# Altium PCB head.PcbDoc
Units mm, origin at the board's own origin, x right, y up, seen from the top; angles counter-clockwise.
Board outline 15 x 25 mm, 4 copper layers (Top Layer, GND, PWR, Bottom Layer), stack 1.571 mm thick; 25 components, 22 nets, 90 pads, 34 vias.
Unrouted connection lines stored in the file: 16.
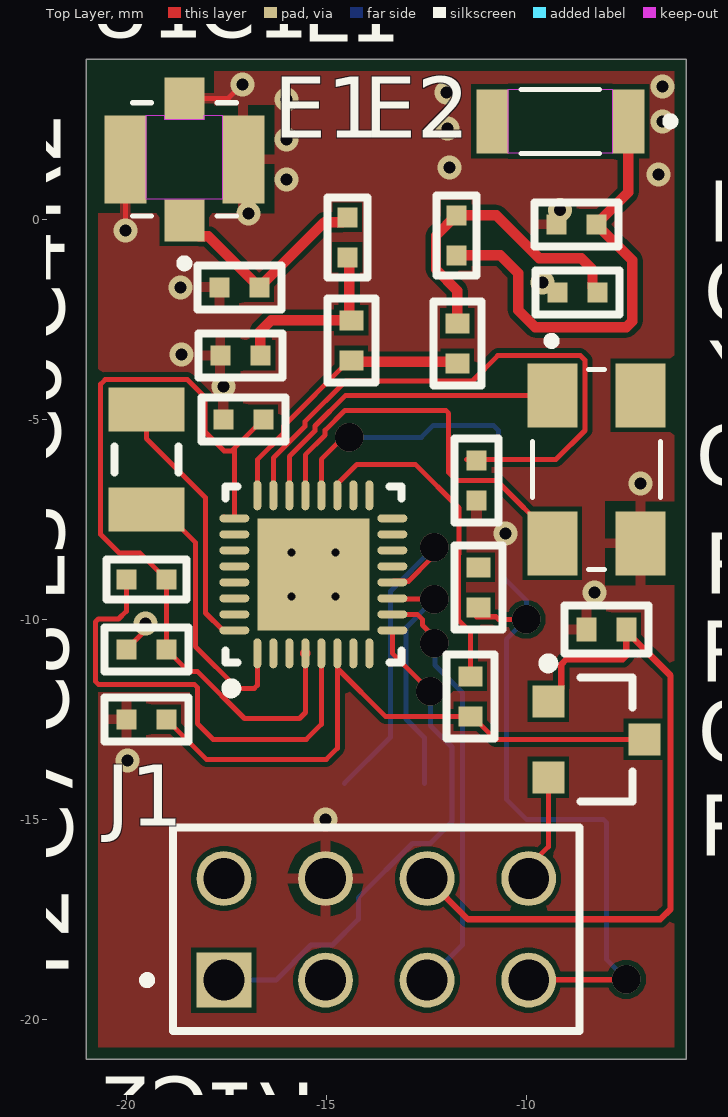
[diagram p0: Top Layer view]
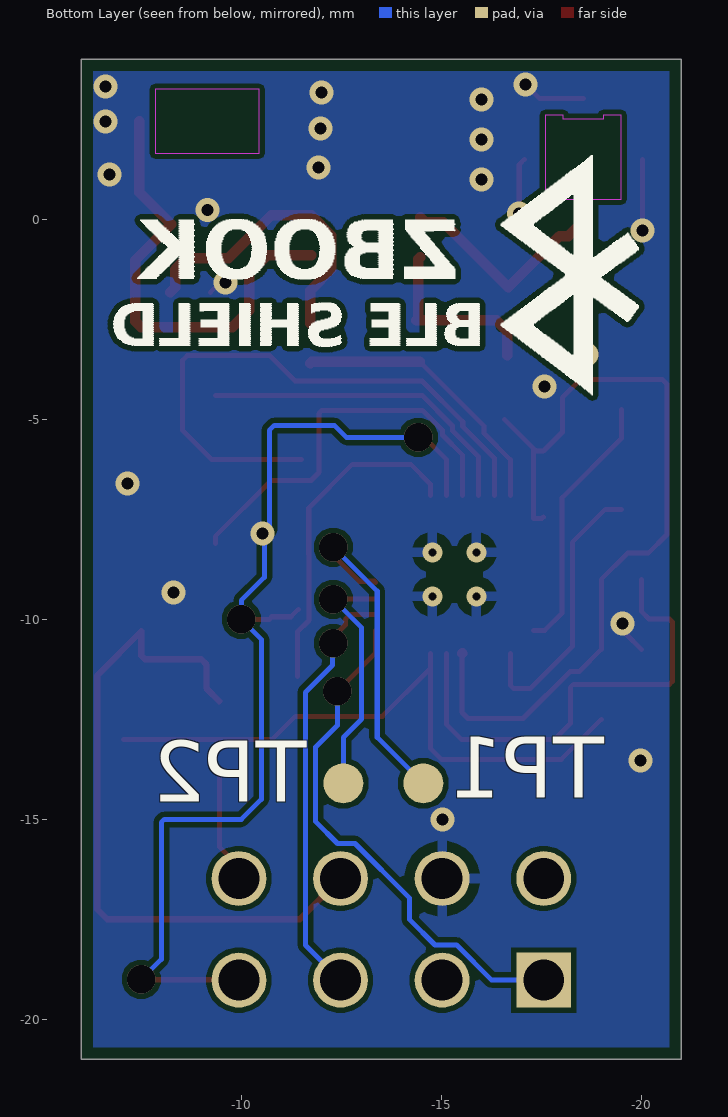
[diagram p1: Bottom Layer view, seen from below]
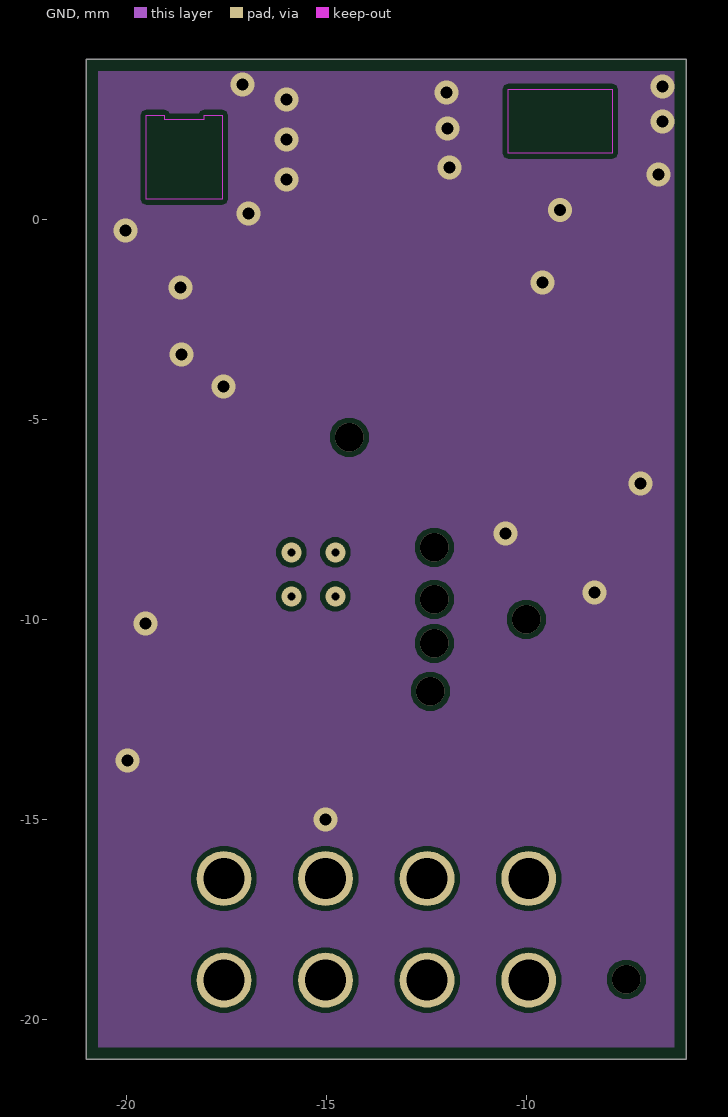
[diagram p2: GND]
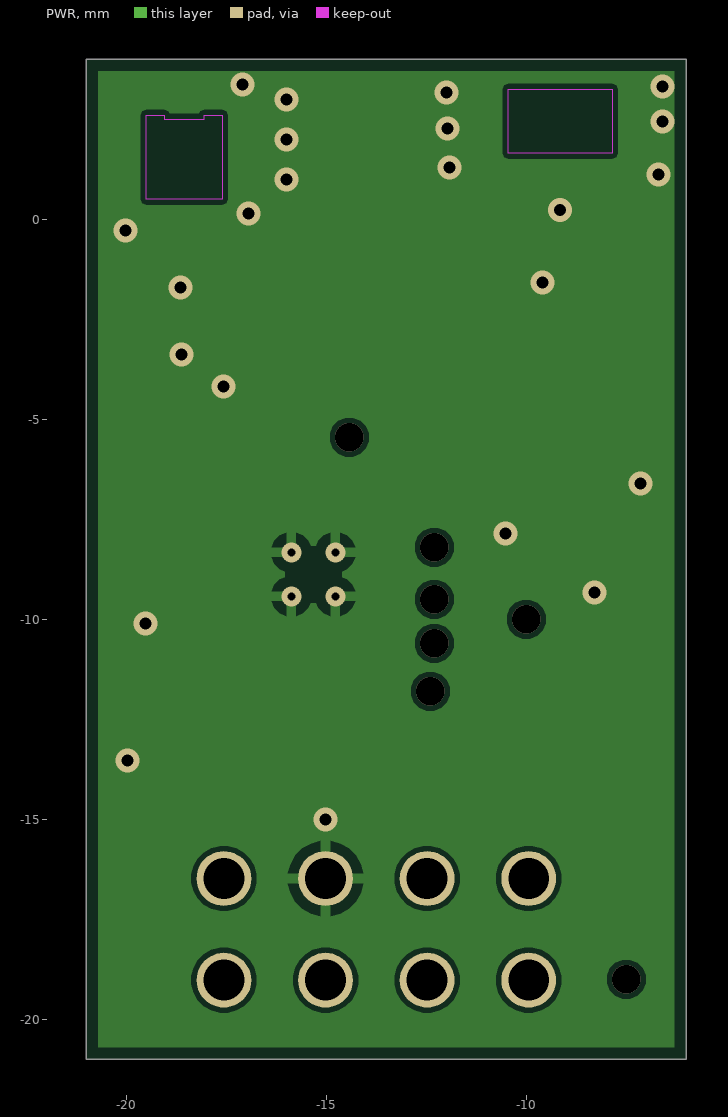
[diagram p3: PWR]
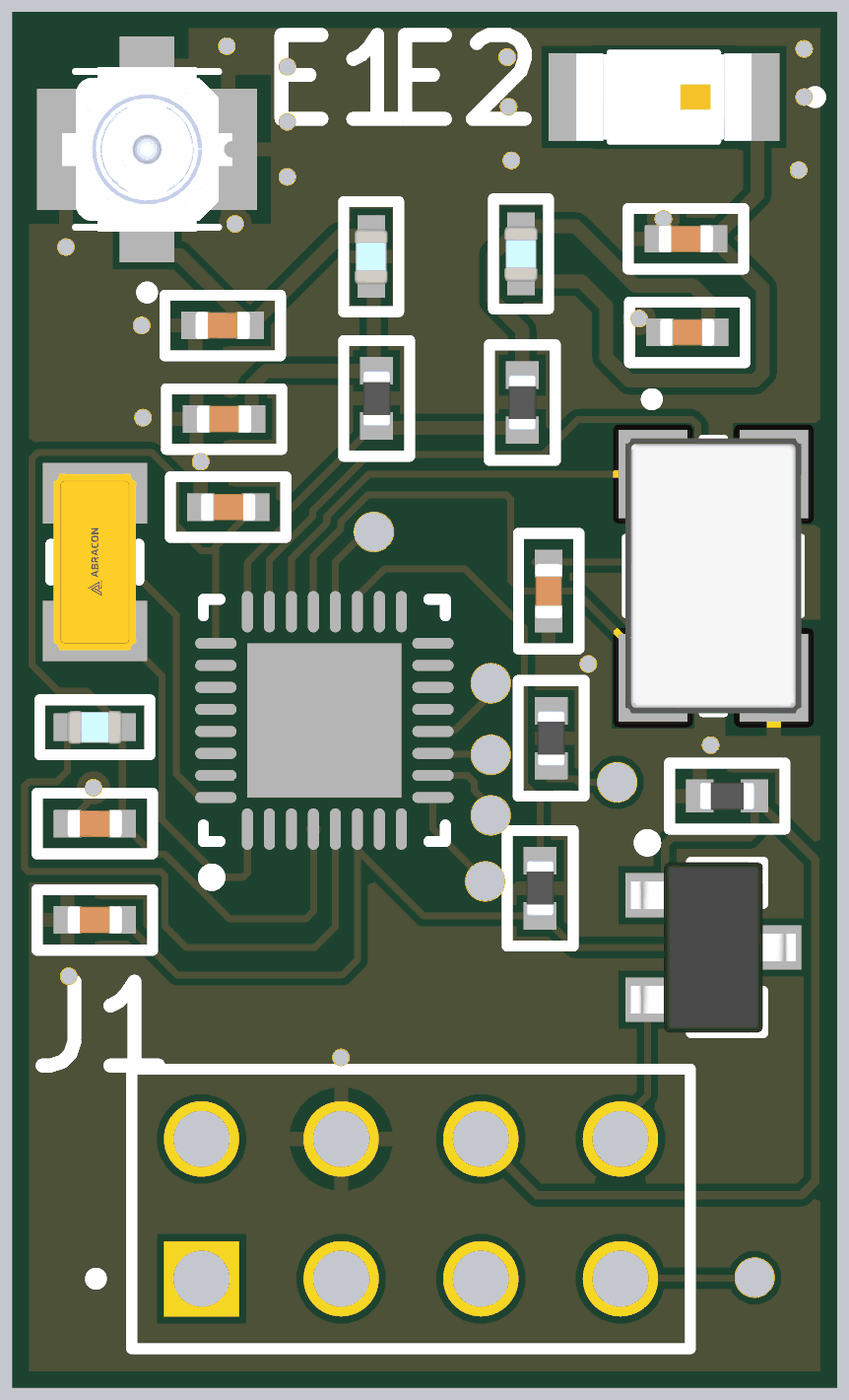
[diagram p4: 3D render of the assembled board from above, using the file's embedded part models]

## Layer stack, top to bottom
Top Solder: solder mask 0.0102, Solder Resist, Dk 3.5
Top Layer: signal copper 0.0356
Dielectric 2: prepreg 0.2, PP-006, Dk 4.1
GND: signal copper 0.0175
Dielectric 1: dielectric 1.065, FR-4, Dk 4.8
PWR: signal copper 0.0175
Dielectric 3: prepreg 0.2, PP-006, Dk 4.1
Bottom Layer: signal copper 0.0356
Bottom Solder: solder mask 0.0102, Solder Resist, Dk 3.5

## Board outline
-21,-21 -21,4 -6,4 -6,-21

## Design rules (kind name [scope] priority, off if disabled: settings)
Clearance [All] p1: gap=0.127 ignorepadtopadclearanceinfootprint=FALSE
PolygonConnect [All] p1: connectstyle=Relief reliefconductorwidth=0.254 reliefentries=4 polygonreliefangle="90 Angle" airgapwidth=0.254
RoutingVias [All] p1: holewidth=0.711 width=1.27 viastyle="Through Hole" minholewidth=0.711 minwidth=1.27 maxholewidth=0.711 maxwidth=1.27
SolderMaskExpansion [All] p1: expansion=0 istentingtop=FALSE
SupplyNets "Schematic Supply Nets_2" [InNet('GND')] p1: voltage=0.000
SupplyNets "Schematic Supply Nets_1" [InNet('VCC')] p2: voltage=0.000
SupplyNets "Schematic Supply Nets" [InNet('VDC')] p3: voltage=0.000
Width [All] p1: maxlimit=2 minlimit=0.127 preferedwidth=0.25 minimp=50.000000 maximp=50.000000 favimp=50.000000
30 further rules are at their usual default settings.

## Components (designator, comment, footprint, x,y, rotation, side; value= is the part's Value field where it differs from the comment)
C1 "NC" C0402#1 -17.175,-1.7 r0 top
C2 "NC" C0402#1 -17.15,-3.4 r0 top
C3 "NC" C0402#2 -8.725,-1.825 r0 top
C4 "NC" C0402#2 -8.75,-0.125 r0 top
C5 "0.47 uF" C0402#1 -11.245,-6.527 r90 top
C6 "0.1 uF" C0402#1 -17.075,-5 r0 top
C7 "2.2 uF" C0402#1 -19.5,-12.5 r0 top
C8 "4.7 uF" C0402#1 -19.5,-10.75 r0 top
E1 "20441-001E-01" IPEX_20441-001E-01 -18.55,1.5 r0 top
E2 "2450AT18A0100001E" XCVR_2450AT18A0100001E -9.15,2.45 r180 top
J1 "MTSW-104-07-T-D-240-LL" SAMTEC_MTSW-104-07-T-D-240-LL -13.75,-17.75 r0 top
L1 "0R" L0402 -14.475,-0.45 r270 top
L2 "0R" L0402 -11.75,-0.4 r270 top
L3 "10uH" L0402 -19.5,-9 r0 top
Q1 "AO3401A" AO-SOT-23-3L_V -8.25,-13 r0 top
R1 "0 R" R0402 -14.375,-3.025 r90 top
R2 "0 R" R0402 -11.725,-3.1 r90 top
R3 "10K" R0402 -8,-10.25 r0 top
R4 "10K" R0402 -11.4,-11.925 r270 top
R5 "10K" R0402 -11.2,-9.2 r90 top
TP1 "TestPoint" "Test Point" -14.55,-14.1 r90 top
TP2 "TestPoint" "Test Point" -12.55,-14.1 r90 top
U1 "CH592X" QFN40P400X400X80_HS-33N -15.325,-8.875 r90 top
Y1 "ECS-320-10-30B-CKM-TR" XTAL_ECS-320-10-30B-CKM-TR -8.25,-6.25 r270 top
Y2 "ABS07-32.768KHZ-T" FP-ABS07-MFG -19.5,-6 r90 top

## Footprints (in the part's own frame and the unit in brackets; to place one, negate y for a bottom-side part, rotate by r counter-clockwise, add the part's x,y. Pads: shape width x height; smd on the part's side, far side on the other; paste and mask are expansions set on the pad)
AO-SOT-23-3L_V [mm] "SOT23, 3-Leads, Body 3.1x1.8mm, Pitch 0.95mm"
  rect 0.8x0.8 smd: 1(-1.2,0.95) 2(-1.2,-0.95) 3(1.2,0)
  silkscreen extent -1.32,-1.55 0.9,2.02, body extent -1.5,-1.55 1.5,1.55, height 1.25
C0402#1 [mm]
  rect 0.5x0.5 smd: 1(-0.5,0) 2(0.5,0)
  silkscreen extent -1.05,-0.55 1.05,0.55, body extent -0.5,-0.25 0.5,0.25, height 0.51
C0402#2 [mm]
  rect 0.5x0.5 smd mask+0: 1(-0.5,0)
  rect 0.5x0.5 smd: 2(0.5,0)
  silkscreen extent -1.05,-0.55 1.05,0.55, body extent -0.5,-0.25 0.5,0.25, height 0.51
FP-ABS07-MFG [mm]
  rect 1.1x1.9 smd paste+0 mask+0: 1(-1.25,0) 2(1.25,0)
  silkscreen extent -0.33,-0.8 0.33,0.8, body extent -1.9,-1.05 1.9,1.05, height 0.25
IPEX_20441-001E-01 [mm]
  rect 1x1.05 smd: 1(0,-1.525) G2(0,1.525)
  rect 1.05x2.2 smd: G1(-1.475,0) G3(1.475,0)
  Keep-Out Layer region: 0.95,-1 -0.95,-1 -0.95,1.1 -0.5,1.1 -0.5,1 0.5,1 0.5,1.1 0.95,1.1
  silkscreen extent -1.3,-2.7 1.3,1.41, body extent -1.5,-1.55 1.5,1.55, height 1.25
L0402 [mm]
  rect 0.5x0.5 smd: 1(-0.5,0) 2(0.5,0)
  silkscreen extent -1,-0.5 1,0.5, body extent -0.5,-0.3 0.5,0.3, height 0.51
QFN40P400X400X80_HS-33N [mm] "QFN, 32-Leads, Body 4,00x4,00mm, Pitch 0,40mm, Thermal Pad 2,80x2,80mm, IPC Medium Density"
  rect 2.8x2.8 smd: 0(0,0)
  oval 0.75x0.2 smd: 1(-1.975,1.4) 2(-1.975,1) 3(-1.975,0.6) 4(-1.975,0.2) 5(-1.975,-0.2) 6(-1.975,-0.6) 7(-1.975,-1) 8(-1.975,-1.4) 17(1.975,-1.4) 18(1.975,-1) 19(1.975,-0.6) 20(1.975,-0.2) 21(1.975,0.2) 22(1.975,0.6) 23(1.975,1) 24(1.975,1.4)
  oval 0.2x0.75 smd: 9(-1.4,-1.975) 10(-1,-1.975) 11(-0.6,-1.975) 12(-0.2,-1.975) 13(0.2,-1.975) 14(0.6,-1.975) 15(1,-1.975) 16(1.4,-1.975) 25(1.4,1.975) 26(1,1.975) 27(0.6,1.975) 28(0.2,1.975) 29(-0.2,1.975) 30(-0.6,1.975) 31(-1,1.975) 32(-1.4,1.975)
  silkscreen extent -2.97,-2.2 2.2,2.2, body extent -2.54,-2.54 2.54,2.54, height 0.25
R0402 [mm]
  rect 0.5x0.6 smd: 1(-0.5,0) 2(0.5,0)
  silkscreen extent -1.05,-0.6 1.05,0.6, body extent -0.5,-0.25 0.5,0.25, height 0.41
SAMTEC_MTSW-104-07-T-D-240-LL [mm]
  rect 1.37x1.37 / inner round 1.37 / far side rect 1.37x1.37 hole 1.02: 01(-3.81,-1.27)
  round 1.37 hole 1.02: 02(-3.81,1.27) 03(-1.27,-1.27) 04(-1.27,1.27) 05(1.27,-1.27) 06(1.27,1.27) 07(3.81,-1.27) 08(3.81,1.27)
  silkscreen extent -5.83,-2.54 5.08,2.54
"Test Point" [mm]
  round 1 smd far side paste-1: 1(0,0)
XCVR_2450AT18A0100001E [mm]
  rect 0.8x1.6 smd: 1(-1.7,0) 2(1.7,0)
  Keep-Out Layer region: 1.3,-0.8 -1.3,-0.8 -1.3,0.8 1.3,0.8
  Keep-Out Layer region: 1.3,-0.8 -1.3,-0.8 -1.3,0.8 1.3,0.8
  silkscreen extent -2.85,-0.8 0.98,0.8, body extent -1.6,-0.8 1.6,0.8, height 1.4
XTAL_ECS-320-10-30B-CKM-TR [mm]
  rect 1.6x1.25 smd paste+0 mask+0.102: 1(-1.85,-1.1) 2(1.85,-1.1) 3(1.85,1.1) 4(-1.85,1.1)
  silkscreen extent -3.31,-1.6 2.5,1.6, body extent -2.5,-1.6 2.5,1.6, height 0.85

## Part data
C1 C2 C3 C4: library part MLCC_0402_NC, "MLCC - NC 0402"
C5: library part "MLCC_0402_0.47 uF", "MLCC - 0.47 uF 0402"
C6: library part "MLCC_0402_0.1 uF", "MLCC - 0.1 uF 0402"
C7: library part "MLCC_0402_2.2 uF", "MLCC - 2.2 uF 0402"
C8: library part "MLCC_0402_4.7 uF", "MLCC - 4.7 uF 0402"
E1: "U.FL (UMCC), I-PEX MHFI Connector Receptacle, Male Pin 50 Ohms Surface Mount Sol", Frequency=9GHz, Manufacturer=I-PEX, Max Operating Temperature=90°C, Min Operating Temperature=-40°C, Supplier Part Number=5378-20441-001E-01DKR-ND, Voltage Rating=60V, Category="RF / Coaxial Connectors", ComponentLink1Description=https://datasheet.octopart.com:443/20441-001E-01-I-PEX-datasheet-180039539.pdf?src-supplier=IHS, ComponentLink1URL=https://datasheet.octopart.com:443/20441-001E-01-I-PEX-datasheet-180039539.pdf?src-supplier=IHS, Contact Material="Gold, Nickel", Export Control Classification Number (ECCN) Code=EAR99, Fastening Type=Snap, Gender=Male, Harmonized Tariff Schedule (HTS) Code=8536.69.40.10, Height=1.45mm, Impedance=50Ω, Lifecycle Status=Production, Manufacturer Part Number=20441-001E-01, Number of Contacts=1, Number of Positions=1, Orientation=Straight, Pricing="1=1,04, 10=0,882, 25=0,8268, 50=0,7872, 100=0,7495, 250=0,70256, 500=0,669, 1000=0,63705, 2500=0,59717 (USD)", REACH SVHC=Unaffected, RoHS=Compliant, Stock=35351, Supplier=DigiKey
E2: "SMD Component, 1206, 2.4GHz, 1.3mm H, Solder Mount, SMD", Clock Frequency=2.5GHz, Manufacturer=Knowles, Max Operating Temperature=125°C, Min Operating Temperature=-40°C, Power Rating=2W, Supplier Part Number=712-2450AT18A0100001EDKR-ND, Bandwidth=100MHz, Category="RF Antennas", ComponentLink1Description=https://datasheet.octopart.com:443/2450AT18A0100001E-Johanson-datasheet-137404838.pdf?src-supplier=Upverter, ComponentLink1URL=https://datasheet.octopart.com:443/2450AT18A0100001E-Johanson-datasheet-137404838.pdf?src-supplier=Upverter, ComponentLink2Description=https://datasheet.octopart.com:443/2450AT18A0100001E-Johanson-datasheet-101575227.pdf?src-supplier=Newark, ComponentLink2URL=https://datasheet.octopart.com:443/2450AT18A0100001E-Johanson-datasheet-101575227.pdf?src-supplier=Newark, Country of Origin=Taiwan, Export Control Classification Number (ECCN) Code=EAR99, Gain=0.5dB, Harmonized Tariff Schedule (HTS) Code=8529.10, Height=1.4mm, Impedance=50Ω, Introduction Date=2024-07-01, Lifecycle Status=Production, Manufacturer Part Number=2450AT18A0100001E, Number of Bands=1, Pricing="1=0,52, 10=0,446, 25=0,4196, 100=0,384, 250=0,36244, 500=0,3472, 1000=0,3328 (USD)", REACH SVHC=Unaffected, Return Loss=9.5dB, RoHS=Compliant, Stock=203443, Supplier=DigiKey
J1: "Conn Unshrouded Header HDR 8 POS 2.54mm Solder ST Top Entry Thru-Hole Bulk", Manufacturer=Samtec, Manufacturer Lifecycle Status=PRODUCTION, Supplier Part Number=612-MTSW-104-07-T-D-240-LL-ND, Category="Headers and Wire Housings", ComponentLink1Description=https://datasheet.octopart.com:443/MTSW-104-07-T-D-240-LL-Samtec-datasheet-97134619.pdf?src-supplier=Samtec, ComponentLink1URL=https://datasheet.octopart.com:443/MTSW-104-07-T-D-240-LL-Samtec-datasheet-97134619.pdf?src-supplier=Samtec, ComponentLink2Description=https://sigma.octopart.com:443/97134620/technical_drawing/Samtec-MTSW-104-07-T-D-240-LL.pdf?src-supplier=Samtec, ComponentLink2URL=https://sigma.octopart.com:443/97134620/technical_drawing/Samtec-MTSW-104-07-T-D-240-LL.pdf?src-supplier=Samtec, ComponentLink3Description=https://datasheet.octopart.com:443/MTSW-104-07-T-D-240-LL-Samtec-datasheet-118493423.pdf?src-supplier=Electro+Sonic, ComponentLink3URL=https://datasheet.octopart.com:443/MTSW-104-07-T-D-240-LL-Samtec-datasheet-118493423.pdf?src-supplier=Electro+Sonic, ComponentLink4Description=https://datasheet.octopart.com:443/MTSW-104-07-T-D-240-LL-Samtec-datasheet-86819181.pdf?src-supplier=Sager+Electronics, ComponentLink4URL=https://datasheet.octopart.com:443/MTSW-104-07-T-D-240-LL-Samtec-datasheet-86819181.pdf?src-supplier=Sager+Electronics, ComponentLink5Description=https://datasheet.octopart.com:443/MTSW-104-07-T-D-240-LL-Samtec-datasheet-166224765.pdf?src-supplier=Sager+Electronics, ComponentLink5URL=https://datasheet.octopart.com:443/MTSW-104-07-T-D-240-LL-Samtec-datasheet-166224765.pdf?src-supplier=Sager+Electronics, ComponentLink6Description=https://datasheet.octopart.com:443/MTSW-104-07-T-D-240-LL-Samtec-datasheet-158401026.pdf?src-supplier=Sager+Electronics, ComponentLink6URL=https://datasheet.octopart.com:443/MTSW-104-07-T-D-240-LL-Samtec-datasheet-158401026.pdf?src-supplier=Sager+Electronics, ComponentLink7Description=https://datasheet.octopart.com:443/MTSW-104-07-T-D-240-LL-Samtec-datasheet-151470471.pdf?src-supplier=Sager+Electronics, ComponentLink7URL=https://datasheet.octopart.com:443/MTSW-104-07-T-D-240-LL-Samtec-datasheet-151470471.pdf?src-supplier=Sager+Electronics, ComponentLink8Description=https://datasheet.octopart.com:443/MTSW-104-07-T-D-240-LL-Samtec-datasheet-180249843.pdf?src-supplier=JRH+Electronics, ComponentLink8URL=https://datasheet.octopart.com:443/MTSW-104-07-T-D-240-LL-Samtec-datasheet-180249843.pdf?src-supplier=JRH+Electronics, ComponentLink9Description=https://datasheet.octopart.com:443/MTSW-104-07-T-D-240-LL-Samtec-datasheet-104272029.pdf?src-supplier=Newark, ComponentLink9URL=https://datasheet.octopart.com:443/MTSW-104-07-T-D-240-LL-Samtec-datasheet-104272029.pdf?src-supplier=Newark, Contact Material=Bronze, Contact Plating=Tin, Gender=Male, Lead Free="Lead Free", Lead Pitch=2.54mm, Lifecycle Status=Production, Manufacturer Part Number=MTSW-104-07-T-D-240-LL, Mounting Technology="Through Hole", Number of Contacts=8, Number of Rows=2, Packaging=Bulk, Pitch=2.54mm, Pricing="1=0,56 (USD)", Radiation Hardening=No, RoHS=Compliant, Supplier=DigiKey, Termination=Solder
L1 L2: library part Inductor_0402, "INDUCTOR - 0R 0402"
L3: library part Inductor_0402_10uH, "INDUCTOR - 10uH - 0402"
Q1: "Transistor: P-MOSFET; unipolar; -30V; 4, 2A; 1, 4W; 85 mOhm; ; -55+150 st.C; SMD; SOT23", Case/Package=TO-236-3, Continuous Drain Current (ID)=4A, Drain to Source Breakdown Voltage=-30V, Drain to Source Resistance=50mΩ, Gate to Source Voltage (Vgs)=12V, Input Capacitance=1.2nF, Manufacturer="Alpha & Omega Semiconductor", Max Junction Temperature (Tj)=150°C, Max Power Dissipation=1.4W, Min Breakdown Voltage=30V, Min Operating Temperature=-55°C, Supplier Part Number=785-1001-6-ND, Threshold Voltage=-900mV, Category=MOSFETs, ComponentLink1Description=https://datasheet.octopart.com:443/AO3401A-Alpha-%26-Omega-Semiconductor-datasheet-11631723.pdf?src-supplier=IHS, ComponentLink1URL=https://datasheet.octopart.com:443/AO3401A-Alpha-%26-Omega-Semiconductor-datasheet-11631723.pdf?src-supplier=IHS, ComponentLink2Description=https://sigma.octopart.com:443/138895710/technical_drawing/Alpha-%26-Omega-Semiconductor-AO3401A.pdf?src-supplier=Upverter, ComponentLink2URL=https://sigma.octopart.com:443/138895710/technical_drawing/Alpha-%26-Omega-Semiconductor-AO3401A.pdf?src-supplier=Upverter, ComponentLink3Description=https://sigma.octopart.com:443/140150677/technical_drawing/Alpha-%26-Omega-Semiconductor-AO3401A.pdf?src-supplier=Alpha+%26+Omega+Semiconductor+SCT, ComponentLink3URL=https://sigma.octopart.com:443/140150677/technical_drawing/Alpha-%26-Omega-Semiconductor-AO3401A.pdf?src-supplier=Alpha+%26+Omega+Semiconductor+SCT, ComponentLink4Description=https://datasheet.octopart.com:443/AO3401A-Alpha-%26-Omega-Semiconductor-datasheet-14060796.pdf?src-supplier=iiiC, ComponentLink4URL=https://datasheet.octopart.com:443/AO3401A-Alpha-%26-Omega-Semiconductor-datasheet-14060796.pdf?src-supplier=iiiC, Country of Origin="Mainland China", Drain to Source Voltage (Vds)=-30V, Export Control Classification Number (ECCN) Code=EAR99, Height=1.25mm, Introduction Date=2007-04-10, Lead Free="Lead Free", Lifecycle Status=Production, Manufacturer Part Number=AO3401A, Max Operating Temperature=150°C, Mounting Technology="Surface Mount", Number of Channels=1, Number of Elements=1, Number of Terminals=3, Pins=3, Power Dissipation=1.4W, Pricing="1=0,52, 10=0,322, 50=0,2332, 100=0,2043, 500=0,15316 (USD)", Radiation Hardening=No, Rds On Max=44mΩ, REACH SVHC=Unaffected, RoHS=Compliant, Schedule B="8541290080, 8541290080|8541290080|8541290080|8541290080|8541290080", Stock=369049, Supplier=DigiKey, Turn-Off Delay Time=41ns, Turn-On Delay Time=6.5ns
R1 R2: library part Resistor_0402_0R, "Resistor - 0R 0402"
R3 R4 R5: library part Resistor_0402_10K, "Resistor - 10K 0402"
TP1 TP2: library part Test_Point, "MECH - Test Points"
Y1: "Crystal 32MHz ±10ppm (Tol) ±10ppm (Stability) 10pF FUND 30Ohm 4-Pin Mini-SMD T/R", Frequency=32MHz, Frequency Stability=10ppm, Frequency Tolerance=0.001%, Load Capacitance=10pF, Manufacturer="ECS International", Max Operating Temperature=70°C, Min Operating Temperature=-20°C, Supplier Part Number=XC2598DKR-ND, Category=Crystals, ComponentLink1Description=https://datasheet.octopart.com:443/ECS-320-10-30B-CKM-TR-ECS-International-datasheet-182217385.pdf?src-supplier=IHS, ComponentLink1URL=https://datasheet.octopart.com:443/ECS-320-10-30B-CKM-TR-ECS-International-datasheet-182217385.pdf?src-supplier=IHS, ComponentLink2Description=https://datasheet.octopart.com:443/ECS-320-10-30B-CKM-TR-ECS-International-datasheet-145012644.pdf?src-supplier=Electro+Sonic, ComponentLink2URL=https://datasheet.octopart.com:443/ECS-320-10-30B-CKM-TR-ECS-International-datasheet-145012644.pdf?src-supplier=Electro+Sonic, ComponentLink3Description=https://datasheet.octopart.com:443/ECS-320-10-30B-CKM-TR-ECS-International-datasheet-17018651.pdf?src-supplier=Electro+Sonic, ComponentLink3URL=https://datasheet.octopart.com:443/ECS-320-10-30B-CKM-TR-ECS-International-datasheet-17018651.pdf?src-supplier=Electro+Sonic, ESR=30Ω, Export Control Classification Number (ECCN) Code=EAR99, Harmonized Tariff Schedule (HTS) Code=8541.60.00.60, Introduction Date=2017-12-19, Lifecycle Status=Production, Manufacturer Part Number=ECS-320-10-30B-CKM-TR, Mounting Technology="Surface Mount", Pricing="1=0,72, 10=0,628, 25=0,594, 50=0,5694, 100=0,5458, 250=0,51616, 500=0,49482 (USD)", REACH SVHC=Unaffected, RoHS=Compliant, Schedule B="8541600060, 8541600060|8541600060, 8541600060|8541600060|8541600060, 8541600060|8541600060|8541600060|8541600060", Stock=4696, Supplier=DigiKey
Y2: library part CMP-0447-00001-4, "Crystal 32.768kHz ±20ppm (Tol) 12.5pF FUND 70kΩ 2-Pin CSMD T/R", Case/Package=CSMD, ESR (Equivalent Series Resistance)=70kR, Frequency=32.768kHz, Frequency Tolerance=20ppm, Load Capacitance=12.5pF, Max Operating Temperature=85°C, Min Operating Temperature=-40°C, Operating Frequency="32.768 kHz", Package Quantity=3000, Depth=1.5mm, Height=0.9mm, Lead Free="Lead Free", Length=3.2mm, Number of Pins=2, Packaging="Tape and Reel", Radiation Hardening=No, REACH SVHC="No SVHC", RoHS Compliant=Yes, Series=ABS07, Series Resistance=70kR, Termination=SMD/SMT, Tolerance=20ppm, Width=1.5mm

## Via types
v1: diameter 0.6, hole 0.3, Top Layer to Bottom Layer, tented both sides, 23 vias
v2: diameter 0.711, hole 0.711, Top Layer to Bottom Layer, tented both sides, 7 vias
v3: diameter 0.5, hole 0.2, Top Layer to Bottom Layer, 4 vias

## Nets (pads, with @x,y where several pads share a name; then routed paths per layer and width w, separated by ;. In a path a pad name is that pad's centre, name@x,y a point inside that pad or via, vN(x,y) a via of type N, cw(c..) or ccw(c..) an arc to the next point about the centre after c; other vN are vias at no path point)
+3V3: J1.08 Q1.2 | length 2.7
  Top Layer w0.127: J1.08@-9.94,-16.178 -9.45,-15.688 Q1.2
  Top Layer w0.254: J1.08 J1.08@-9.94,-16.178
BOOT_N: J1.07 R5.1 U1.20 | length 26.3
  Top Layer w0.127: U1.20 -15.125,-6 -14.575,-5.45 v2(-14.425,-5.45) ; R5.1@-11.425,-9.75 -11.238,-9.936 -10.761,-9.936 -10.697,-10 v2(-10,-10) ; J1.07 -9.93,-19.01 -7.51,-19.01 v2(-7.5,-19)
  Bottom Layer w0.127: v2(-14.425,-5.45) -12.624,-5.45 -12.324,-5.15 -10.825,-5.15 -10.7,-5.275 -10.7,-7.775 -10.575,-7.9 -10.575,-8.95 -10,-9.525 v2(-10,-10) -10.5,-10.5 -10.5,-14.5 -10,-15 -8.074,-15 -8,-15.074 -8,-18.5 v2(-7.5,-19)
GND: C1.1 C2.1 C3.1 C4.1 C5.1 C6.1 C7.1 C8.1 E1.G1 E1.G2 E1.G3 J1.04 R3.1 U1.0 Y1.3 | length 6.1
  Top Layer w0.127: v1(-20.025,-0.275) E1.G1 ; C8.1 -19.616,-10.366 -19.616,-10.191 v1(-19.525,-10.1) ; E1.G2 -17.45,3.025 v1(-17.1,3.375) ; E1.G3 -16.948,1.373 v1(-16.948,0.146) ; v1(-9.6,-1.575) -9.475,-1.575 C3.1
  other v1: -15.025,-15 -19.975,-13.525 -8.3,-9.325 -7.15,-6.6 -17.575,-4.175 -18.625,-3.375 -18.65,-1.7 -9.161,0.237 -16,1 -6.7,1.125 -11.925,1.3 -16,2 -11.975,2.275 -16,3 -12,3.175
  other v3: -15.875,-9.425 -14.775,-9.425 -15.875,-8.325 -14.775,-8.325
NetC1_2: C1.2 E1.1 L1.1 | length 5.5
  Top Layer w0.254: E1.1 -18.55,-0.05 -18.177,-0.423 -17.952,-0.423 C1.2 -15.048,-0.073 -14.598,-0.073 L1.1
NetC2_2: C2.2 L1.2 R1.2 | length 4.6
  Top Layer w0.254: C2.2 -16.65,-2.8 -16.375,-2.525 R1.2 -14.425,-2.475 -14.425,-1 L1.2
NetC3_2: C3.2 L2.1 R2.2 | length 7.7
  Top Layer w0.254: R2.2 -11.725,-1.784 -12.254,-1.255 -12.254,-0.404 L2.1 -10.75,0.1 -9.675,-0.975 -8.625,-0.975 -8.348,-1.252 -8.348,-1.702 C3.2
NetC4_2: C4.2 E2.1 L2.2 | length 11.5
  Top Layer w0.254: L2.2 -10.65,-0.9 -10.2,-1.35 -10.2,-2.275 -9.775,-2.7 -7.499,-2.7 -7.35,-2.551 -7.35,-1.025 C4.2 -7.45,0.675 E2.1
  other v1: -6.6,2.45 -6.6,3.325
NetC5_2: C5.2 U1.23 | length 14.9
  Top Layer w0.127: U1.23 -16.325,-5.968 -15.536,-5.18 -15.536,-5.061 -14.516,-4.04 -11.346,-4.04 -10.715,-3.41 -8.646,-3.41 -8.534,-3.521 -8.534,-5.279 -9.256,-6 -11.5,-6
NetR1_1: R1.1 R2.1 U1.24 | length 7
  Top Layer w0.127: U1.24 -16.725,-6.009 -16.071,-5.355 -16.071,-5.171 R1.1@-14.463,-3.562
  Top Layer w0.254: R1.1@-14.463,-3.562 -11.763,-3.562 R2.1
NetR4_1: R4.1 U1.19 | length 8.3
  Top Layer w0.127: U1.19 -14.725,-6.614 -14.236,-6.125 -12.775,-6.125 -11.686,-7.214 -11.686,-8.366 -11.69,-8.371 -11.69,-10.029 -11.4,-10.319 R4.1
NetTP1_1: TP1.1 U1.12 | length 8.2
  Top Layer w0.127: U1.12 -13.323,-9.048 -12.947,-9.048 -12.387,-8.488 v2@-12.387,-8.287
  Bottom Layer w0.127: TP1.1 -13.397,-12.947 -13.397,-9.297 v2(-12.3,-8.2)
NetTP2_1: TP2.1 U1.11 | length 6.1
  Top Layer w0.127: U1.11 -13.338,-9.487 v2@-12.313,-9.487
  Bottom Layer w0.127: TP2.1 -12.55,-12.953 -13.01,-12.493 -13.01,-10.21 v2(-12.3,-9.5)
NetU1_1: U1.1 Y2.1 | length 7
  Top Layer w0.127: Y2.1 -19.1,-7.25 -18.275,-8.075 -18.275,-10.677 -17.227,-11.725 -16.799,-11.725 -16.725,-11.651 U1.1
NetU1_21: U1.21 Y1.2 | length 10.1
  Top Layer w0.127: U1.21 -15.525,-5.887 -15.028,-5.39 -15.028,-5.272 -14.532,-4.775 -12.015,-4.775 -11.94,-4.849 -11.94,-6.329 -11.742,-6.527 -10.748,-6.527 -9.35,-7.925 Y1.2
NetU1_22: U1.22 Y1.1 | length 8.2
  Top Layer w0.127: U1.22 -15.925,-5.928 -15.282,-5.285 -15.282,-5.166 -14.516,-4.4 Y1.1
NetU1_32: U1.32 Y2.2 | length 6.6
  Top Layer w0.127: Y2.2 -19.5,-5.481 -18.021,-6.96 -18.021,-9.84 -17.586,-10.275 U1.32
PWR_EN: J1.06 Q1.1 R3.2 | length 17.4
  Top Layer w0.157: J1.06 -11.46,-17.5 -6.649,-17.5 -6.396,-17.247 -6.396,-11.404 -7.5,-10.3 -7.5,-10.908 -7.592,-11 -9,-11 -9.128,-11.128 -9.128,-11.728 Q1.1
UART_RX: J1.01 U1.9 | length 13.1
  Top Layer w0.127: U1.9 -13.35,-10.85 v2(-12.4,-11.8)
  Bottom Layer w0.127: J1.01 -16.258,-19.02 -15.383,-18.145 -14.844,-18.145 -14.2,-17.5 -14.2,-16.962 -12.843,-15.605 -12.405,-15.605 -11.859,-15.059 -11.859,-13.194 -12.4,-12.654 v2(-12.4,-11.8)
UART_TX: J1.05 U1.10 | length 10.6
  Top Layer w0.127: U1.10 -12.725,-9.875 -12.6,-10 -12.6,-10.142 -12.3,-10.442 v2(-12.3,-10.6)
  Bottom Layer w0.127: J1.05 -11.6,-18.14 -11.6,-11.828 -12.282,-11.146 -12.282,-10.618 v2(-12.3,-10.6)
VCC: C7.2 Q1.3 R4.2 R5.2 U1.6 | length 15.5
  Top Layer w0.127: C7.2 -18,-13.5 -15,-13.5 -14.725,-13.225 U1.6 ; -14.698,-11.253 -13.526,-12.425 R4.2 ; R4.2@-11.35,-12.425 -10.775,-13 Q1.3
VDC: C6.2 C8.2 L3.2 U1.4 U1.25 | length 21.1
  Top Layer w0.127: U1.25@-17.554,-7.441 -17.52,-7.475 U1.25 -17.3,-5.725 ; C6.2 -17.3,-5.725 ; U1.4@-15.519,-10.856 -15.519,-12.332 -15.668,-12.481 -17.044,-12.481 -18.217,-11.308 -18.442,-11.308 C8.2 L3.2 -19.654,-8.346 -20.173,-8.346 -20.64,-7.879 -20.64,-4.121 -20.529,-4.009 -18.471,-4.009 -18.03,-4.451 -18.03,-5.314 -17.554,-5.79 -17.365,-5.79 -17.3,-5.725
  Top Layer w0.254: U1.4 U1.4@-15.519,-10.856
VSW: L3.1 U1.5 | length 11.9
  Top Layer w0.127: L3.1 -20,-9.801 -20.194,-9.994 -20.701,-9.994 -20.775,-10.069 -20.775,-11.551 -20.701,-11.625 -18.299,-11.625 -18.225,-11.699 -18.225,-12.607 -17.832,-13 -15.5,-13 -15.125,-12.625 U1.5
pads on no net: E2.2 J1.02 J1.03 U1.2 U1.3 U1.7 U1.8 U1.13 U1.14 U1.15 U1.16 U1.17 U1.18 U1.26 U1.27 U1.28 U1.29 U1.30 U1.31 Y1.4
copper on no net:
  other v1: -10.525,-7.85

## Polygon pours and split planes (outlines as drawn)
GND on Top Layer "GND_L01_P002" (solid, remove dead copper, pour order 2): -6.3,-20.7 -20.7,-20.7 -20.7,3.7 -6.3,3.7
no net on GND "NONET_L02_P003" (solid, pour order 3): -6.3,-20.7 -20.7,-20.7 -20.7,3.7 -6.3,3.7
GND on PWR "GND_L03_P004" (solid, remove dead copper, pour order 4): -6.3,-20.7 -20.7,-20.7 -20.7,3.7 -6.3,3.7
GND on Bottom Layer "GND_L04_P005" (solid, remove dead copper, pour order 5): -6.3,-20.7 -20.7,-20.7 -20.7,3.7 -6.3,3.7

## Other copper
Top Layer:
  pour cut-out: -6,4 -6,1 -13,1 -13,4
GND:
  pour cut-out: -6,4 -6,1 -12,1 -12,4
PWR:
  pour cut-out: -6,4 -12,4 -12,1 -6,1
Bottom Layer:
  pour cut-out: -6,4 -12,4 -12,1 -6,1

## Silkscreen, mask and mechanical layers (free items; w line width, h text height)
Bottom Overlay:
  drawing of 15 lines, arcs and shapes, not listed
Mechanical 1:
  the board outline again, w0.254